# Altium PCB main.PcbDoc
Units mm, origin at the board's own origin, x right, y up, seen from the top; angles counter-clockwise.
Board outline 43.2 x 21.5 mm, 4 copper layers (Top Layer, GND, Power, Bottom Layer), stack 1.64 mm thick; 21 components, 21 nets, 74 pads, 14 vias.
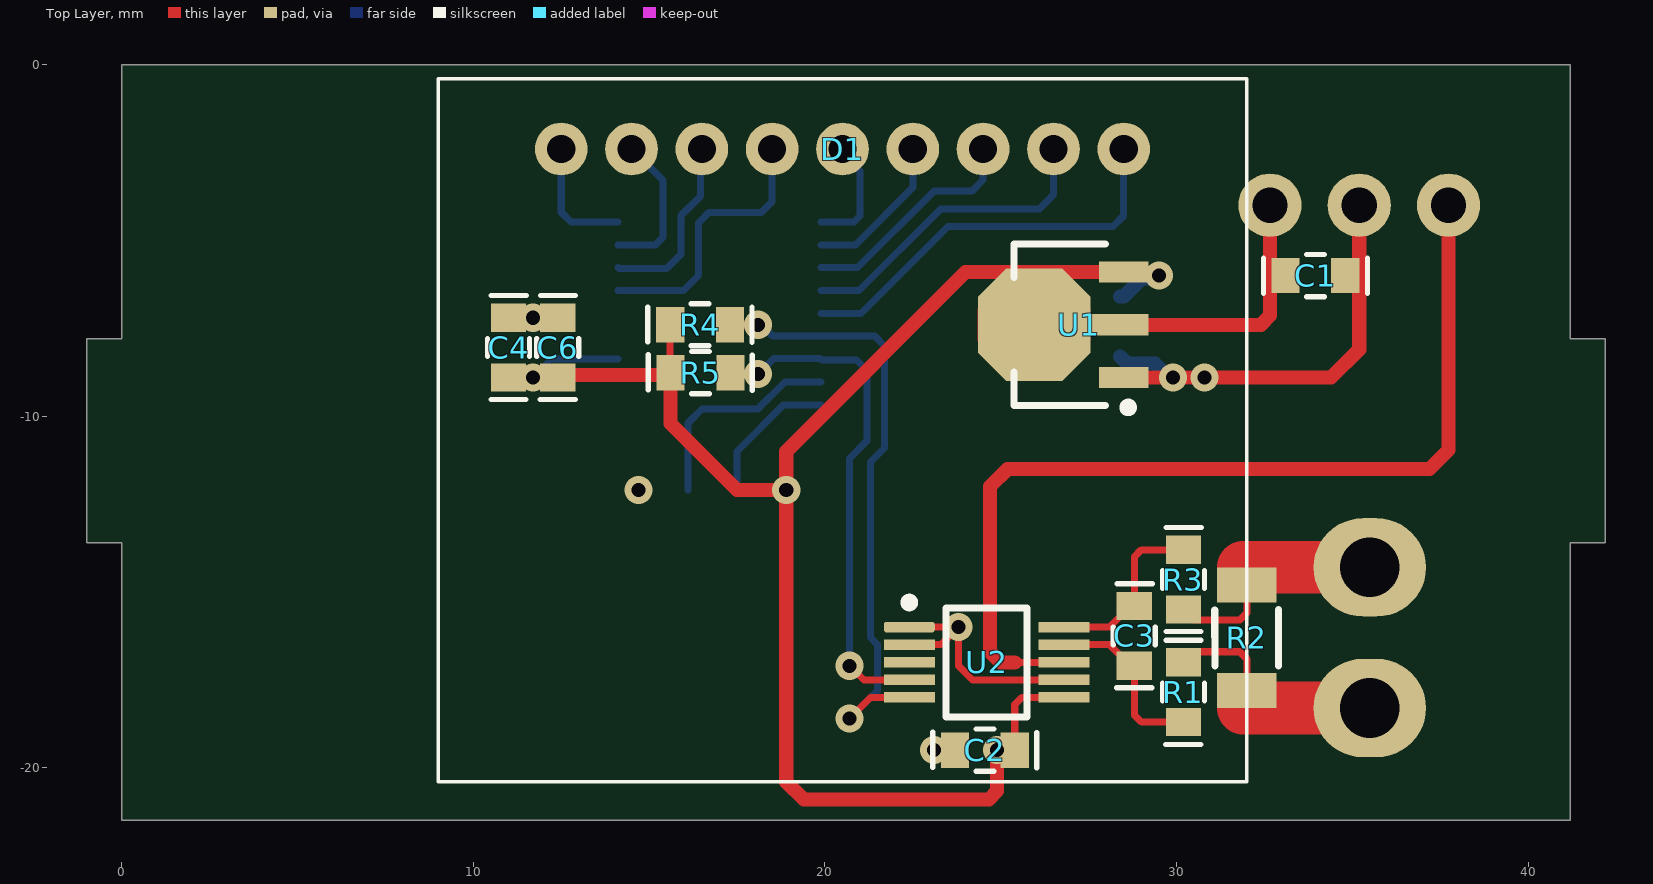
[diagram p0: Top Layer view]
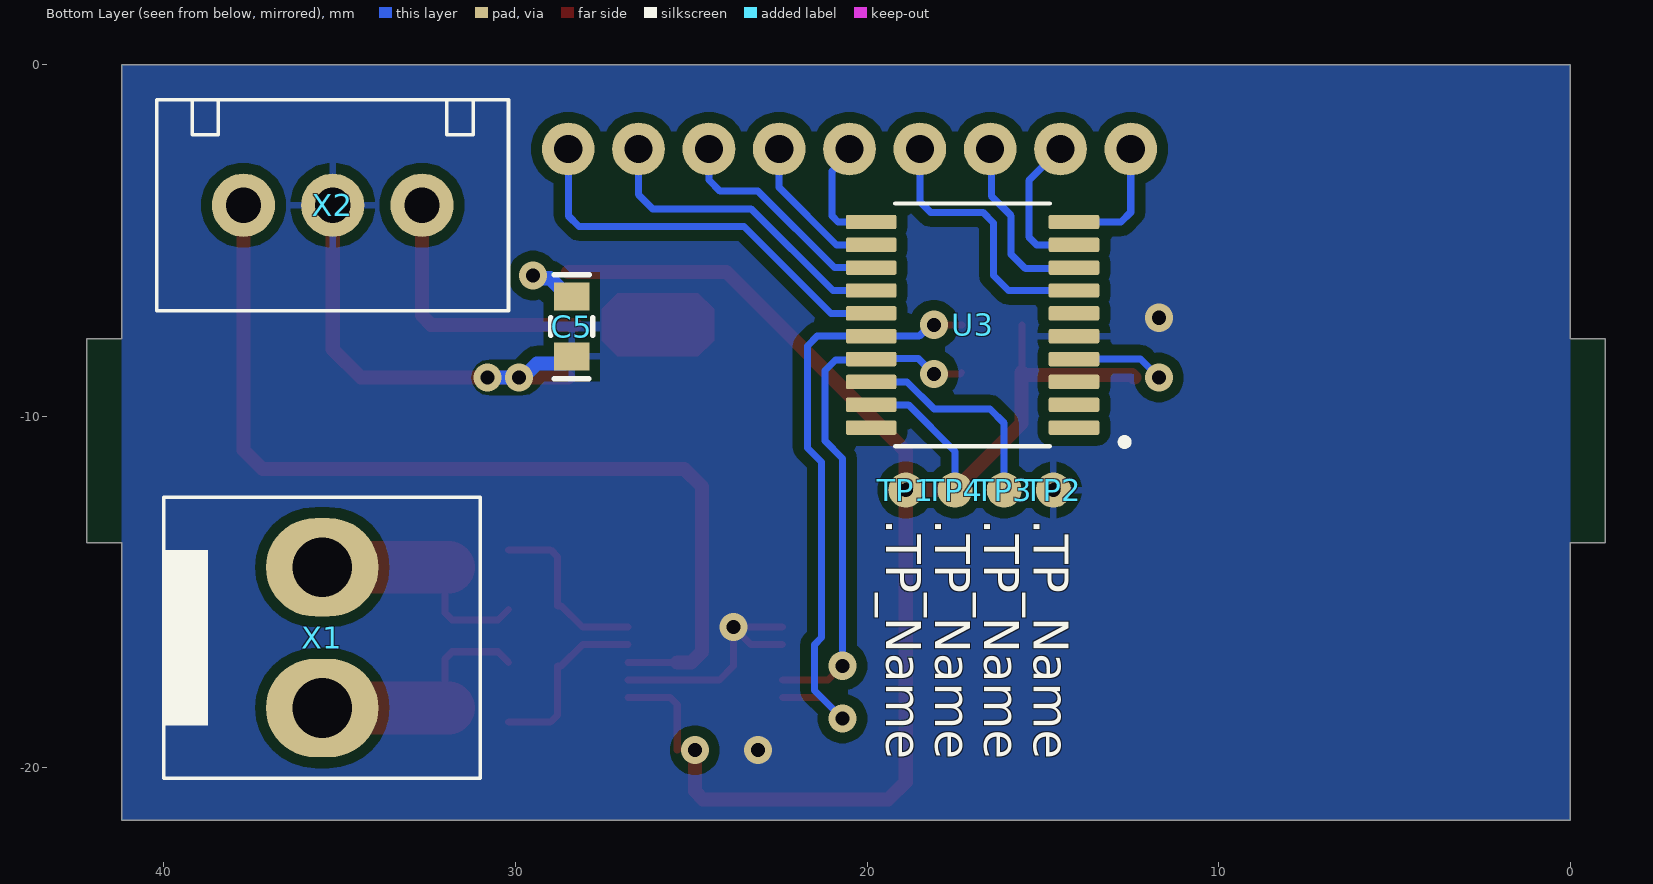
[diagram p1: Bottom Layer view, seen from below]
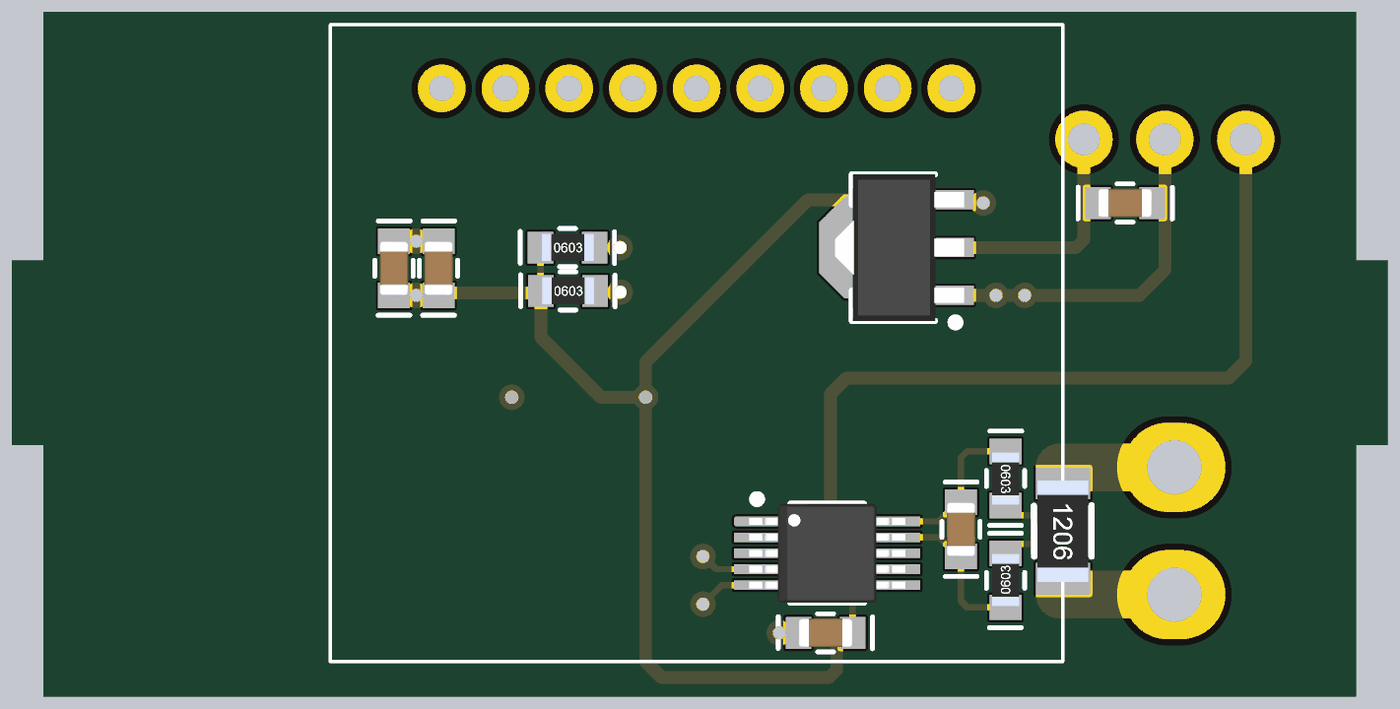
[diagram p2: 3D render of the assembled board from above, using the file's embedded part models]

## Layer stack, top to bottom
Top Solder: solder mask 0.01, Solder Resist, Dk 3.5
Top Layer: signal copper 0.035
Dielectric 1: prepreg 0.25, FR-4, Dk 4.2
GND: signal copper 0.035
Dielectric 4: core 1, PP-006, Dk 4.2
Power: signal copper 0.035
Dielectric 2: prepreg 0.25, Dk 4.2
Bottom Layer: signal copper 0.035
Bottom Solder: solder mask 0.01, Solder Resist, Dk 3.5

## Board outline
-1,-13.6 -1,-7.8 0,-7.8 0,0 41.2,0 41.2,-7.8 42.2,-7.8 42.2,-13.6 41.2,-13.6 41.2,-21.5 0,-21.5 0,-13.6

## Design rules (kind name [scope] priority, off if disabled: settings)
Clearance [All] p1: gap=0.2 ignorepadtopadclearanceinfootprint=FALSE except(0.3: Arc-Poly Track-Poly SMDPad-Poly THPad-Poly Via-Poly Fill-Poly Poly-Poly)
ComponentClearance ComponentClearance_LED [HasFootprint('Disp_7x6_seg')] p1: gap=-1 collisioncheckmode=3 verticalgap=-1 showdistances=FALSE
ComponentClearance [All] p2: gap=0 collisioncheckmode=3 verticalgap=0 showdistances=FALSE
DiffPairsRouting [All] p1: maxlimit=0.254 minlimit=0.254 mostfreqgap=0.254 toplayer_minwidth=0.381 toplayer_maxwidth=0.381 toplayer_prefwidth=0.381 midlayer1_minwidth=0.381 midlayer1_maxwidth=0.381 midlayer1_prefwidth=0.381 midlayer2_minwidth=0.381 midlayer2_maxwidth=0.381 midlayer2_prefwidth=0.381 bottomlayer_minwidth=0.3 bottomlayer_maxwidth=0.3 bottomlayer_prefwidth=0.3 substack1={8A457648-E2D5-4BE0-83BC-ABE9B91CE83C} toplayer_{8a457648-e2d5-4be0-83bc-abe9b91ce83c}_minwidth=0.381 toplayer_{8a457648-e2d5-4be0-83bc-abe9b91ce83c}_maxwidth=0.381 toplayer_{8a457648-e2d5-4be0-83bc-abe9b91ce83c}_prefwidth=0.381 midlayer1_{8a457648-e2d5-4be0-83bc-abe9b91ce83c}_minwidth=0.381 midlayer1_{8a457648-e2d5-4be0-83bc-abe9b91ce83c}_maxwidth=0.381 midlayer1_{8a457648-e2d5-4be0-83bc-abe9b91ce83c}_prefwidth=0.381 midlayer2_{8a457648-e2d5-4be0-83bc-abe9b91ce83c}_minwidth=0.381 midlayer2_{8a457648-e2d5-4be0-83bc-abe9b91ce83c}_maxwidth=0.381 midlayer2_{8a457648-e2d5-4be0-83bc-abe9b91ce83c}_prefwidth=0.381 bottomlayer_{8a457648-e2d5-4be0-83bc-abe9b91ce83c}_minwidth=0.381 bottomlayer_{8a457648-e2d5-4be0-83bc-abe9b91ce83c}_maxwidth=0.381 bottomlayer_{8a457648-e2d5-4be0-83bc-abe9b91ce83c}_prefwidth=0.381 substack2={3620B0BB-043D-4211-A41A-C4F79F826ABF} toplayer_{3620b0bb-043d-4211-a41a-c4f79f826abf}_minwidth=0.381 toplayer_{3620b0bb-043d-4211-a41a-c4f79f826abf}_maxwidth=0.381 toplayer_{3620b0bb-043d-4211-a41a-c4f79f826abf}_prefwidth=0.381 midlayer1_{3620b0bb-043d-4211-a41a-c4f79f826abf}_minwidth=0.381 midlayer1_{3620b0bb-043d-4211-a41a-c4f79f826abf}_maxwidth=0.381 midlayer1_{3620b0bb-043d-4211-a41a-c4f79f826abf}_prefwidth=0.381 midlayer2_{3620b0bb-043d-4211-a41a-c4f79f826abf}_minwidth=0.381 midlayer2_{3620b0bb-043d-4211-a41a-c4f79f826abf}_maxwidth=0.381 midlayer2_{3620b0bb-043d-4211-a41a-c4f79f826abf}_prefwidth=0.381 bottomlayer_{3620b0bb-043d-4211-a41a-c4f79f826abf}_minwidth=0.381 bottomlayer_{3620b0bb-043d-4211-a41a-c4f79f826abf}_maxwidth=0.381 bottomlayer_{3620b0bb-043d-4211-a41a-c4f79f826abf}_prefwidth=0.381 maxuncoupledlength=12.7
DiffPairsRouting DiffPairsRouting_ [All] p2: maxlimit=0.3 minlimit=0.3 mostfreqgap=0.3 toplayer_minwidth=0.3 toplayer_maxwidth=0.3 toplayer_prefwidth=0.3 midlayer1_minwidth=0.3 midlayer1_maxwidth=0.3 midlayer1_prefwidth=0.3 midlayer2_minwidth=0.3 midlayer2_maxwidth=0.3 midlayer2_prefwidth=0.3 bottomlayer_minwidth=0.381 bottomlayer_maxwidth=0.381 bottomlayer_prefwidth=0.381 substack1={8A457648-E2D5-4BE0-83BC-ABE9B91CE83C} toplayer_{8a457648-e2d5-4be0-83bc-abe9b91ce83c}_minwidth=0.381 toplayer_{8a457648-e2d5-4be0-83bc-abe9b91ce83c}_maxwidth=0.381 toplayer_{8a457648-e2d5-4be0-83bc-abe9b91ce83c}_prefwidth=0.381 midlayer1_{8a457648-e2d5-4be0-83bc-abe9b91ce83c}_minwidth=0.381 midlayer1_{8a457648-e2d5-4be0-83bc-abe9b91ce83c}_maxwidth=0.381 midlayer1_{8a457648-e2d5-4be0-83bc-abe9b91ce83c}_prefwidth=0.381 midlayer2_{8a457648-e2d5-4be0-83bc-abe9b91ce83c}_minwidth=0.381 midlayer2_{8a457648-e2d5-4be0-83bc-abe9b91ce83c}_maxwidth=0.381 midlayer2_{8a457648-e2d5-4be0-83bc-abe9b91ce83c}_prefwidth=0.381 bottomlayer_{8a457648-e2d5-4be0-83bc-abe9b91ce83c}_minwidth=0.381 bottomlayer_{8a457648-e2d5-4be0-83bc-abe9b91ce83c}_maxwidth=0.381 bottomlayer_{8a457648-e2d5-4be0-83bc-abe9b91ce83c}_prefwidth=0.381 substack2={3620B0BB-043D-4211-A41A-C4F79F826ABF} toplayer_{3620b0bb-043d-4211-a41a-c4f79f826abf}_minwidth=0.381 toplayer_{3620b0bb-043d-4211-a41a-c4f79f826abf}_maxwidth=0.381 toplayer_{3620b0bb-043d-4211-a41a-c4f79f826abf}_prefwidth=0.381 midlayer1_{3620b0bb-043d-4211-a41a-c4f79f826abf}_minwidth=0.381 midlayer1_{3620b0bb-043d-4211-a41a-c4f79f826abf}_maxwidth=0.381 midlayer1_{3620b0bb-043d-4211-a41a-c4f79f826abf}_prefwidth=0.381 midlayer2_{3620b0bb-043d-4211-a41a-c4f79f826abf}_minwidth=0.381 midlayer2_{3620b0bb-043d-4211-a41a-c4f79f826abf}_maxwidth=0.381 midlayer2_{3620b0bb-043d-4211-a41a-c4f79f826abf}_prefwidth=0.381 bottomlayer_{3620b0bb-043d-4211-a41a-c4f79f826abf}_minwidth=0.381 bottomlayer_{3620b0bb-043d-4211-a41a-c4f79f826abf}_maxwidth=0.381 bottomlayer_{3620b0bb-043d-4211-a41a-c4f79f826abf}_prefwidth=0.381 filterlayerstackid={B436D93C-42E4-4AC7-A21A-CA4998FC654C} maxuncoupledlength=12.7
Height HeightTop [OnTop] p1: minheight=0 maxheight=9 prefheight=7
Height HeightBottom [OnBottom] p2: minheight=0 maxheight=2.5 prefheight=2
HoleSize [All] p1: absolutevalues=TRUE maxlimit=10 minlimit=0.4 maxpercent=80.000 minpercent=20.000
HoleToHoleClearance [All] p1: gap=0.25 allowstackedmicrovias=TRUE
MinimumSolderMaskSliver [All] p1: minsoldermaskwidth=0.1
PlaneClearance [All] p1: clearance=0.4
PlaneConnect PlaneConnectHBR_CUR [InNetClass('HBR_CUR')] p1: planeconnectstyle=Direct reliefexpansion=0.508 reliefentries=4 reliefconductorwidth=0.254 reliefairgap=0.254
PlaneConnect PlaneConnectCASE [InNetClass('CASE')] p2: planeconnectstyle=Direct reliefexpansion=0.508 reliefentries=4 reliefconductorwidth=0.254 reliefairgap=0.254
PlaneConnect PlaneConnectVia [IsVia] p3: planeconnectstyle=Direct reliefexpansion=0.3 reliefentries=4 reliefconductorwidth=0.3 reliefairgap=0.4
PlaneConnect PlaneConnectAll [All] p4: planeconnectstyle=Relief reliefexpansion=0.3 reliefentries=4 reliefconductorwidth=0.3 reliefairgap=0.4
PolygonConnect PolygonConnectCASE [InNetClass('CASE')] p1: connectstyle=Direct reliefconductorwidth=0.254 reliefentries=4 polygonreliefangle="90 Angle" airgapwidth=0.254
PolygonConnect PolygonConnectVia [IsVia] p2: connectstyle=Direct reliefconductorwidth=0.254 reliefentries=4 polygonreliefangle="90 Angle" airgapwidth=0.254
PolygonConnect [All] p3: connectstyle=Relief reliefconductorwidth=0.2 reliefentries=4 polygonreliefangle="90 Angle" airgapwidth=0.3
RoutingCorners [All] p1: cornerstyle=45-Degree minsetback=2 maxsetback=2
RoutingVias [All] p1: holewidth=0.4 width=0.8 viastyle="Through Hole" minholewidth=0.3 minwidth=0.7 maxholewidth=1 maxwidth=1.4
SilkToSilkClearance [All] p1: silktosilkclearance=0
SilkToSolderMaskClearance [IsPad] p1: minsilkscreentomaskgap=0.12 clearancetoexposedcopper=TRUE
SolderMaskExpansion [All] p1: expansion=0.075 istentingtop=FALSE
SupplyNets "Schematic Supply Nets_2" [InNet('GND')] p1: voltage=0.000
SupplyNets "Schematic Supply Nets_1" [InNet('Vin')] p2: voltage=0.000
SupplyNets "Schematic Supply Nets" [InNet('3v3')] p3: voltage=0.000
Width [All] p1: maxlimit=5 minlimit=0.2 preferedwidth=0.2 substack1={8A457648-E2D5-4BE0-83BC-ABE9B91CE83C} substack2={3620B0BB-043D-4211-A41A-C4F79F826ABF}
19 further rules are at their usual default settings.

## Components (designator, comment, footprint, x,y, rotation, side; value= is the part's Value field where it differs from the comment)
C1 "K10-79" SMD_C0603 34.8,-6 r180 top value=0,1мкФ
C2 "K10-79" SMD_C0603 23.7,-19.5 r0 top value=0,1мкФ
C3 "K10-79" SMD_C0603 28.8,-15.4 r270 top value=0,1мкФ
C4 "K10-79" SMD_C0603 11,-7.2 r270 top value=0,1мкФ
C5 "K10-79" SMD_C0603 28.4,-8.3 r90 bottom value=0,1мкФ
C6 "K10-79" SMD_C0603 12.4,-7.2 r270 top value=0,1мкФ
D1 "Disp" Disp_7x6_seg 28.5,-2.4 r180 top locked
R1 "OSM R1-8" SMD_0603 30.2,-18.7 r90 top value=1k
R2 "OSM R1-8" SMD_1206 32,-14.8 r270 top value="50 мОм"
R3 "OSM R1-8" SMD_0603 30.2,-13.8 r270 top value=1k
R4 "OSM R1-8" SMD_0603 15.6,-7.4 r0 top value=4.7k
R5 "OSM R1-8" SMD_0603 15.612,-8.762 r0 top value=4.7k
TP1 "3v3" TP_PAD_1 18.9,-12.1 r270 bottom
TP2 "GND" TP_PAD_1 14.7,-12.1 r270 bottom
TP3 "SWD" TP_PAD_1 16.1,-12.1 r270 bottom
TP4 "SWC" TP_PAD_1 17.5,-12.1 r270 bottom
U1 "HT7133" SOT89 26.7,-7.4 r180 top
U2 "INA226" VSSOP-10 22.4,-16 r0 top
U3 "STM32G030F6P6" TSSOP_20 17,-7.4 r0 bottom
X1 "Cur_con" Cur_con 35.5,-14.3 r270 bottom
X2 "Pwr" Pwr_con 35.2,-4 r180 bottom

## Footprints (in the part's own frame and the unit in brackets; to place one, negate y for a bottom-side part, rotate by r counter-clockwise, add the part's x,y. Pads: shape width x height; smd on the part's side, far side on the other; paste and mask are expansions set on the pad)
Cur_con [mm]
  oval 2.8x3.2 hole 1.7 mask+0.2: 1(0,0) 2(4,0)
  silkscreen extent -2,-4.5 6,4.5
Disp_7x6_seg [mm]
  round 1.5 hole 0.8 mask+0.2: 1(0,0) 2(2,0) 3(4,0) 4(6,0) 5(8,0) 6(10,0) 7(12,0) 8(14,0) 9(16,0)
  silkscreen extent -3.5,-2 19.5,18
Pwr_con [mm]
  round 1.8 hole 1 mask+0.2: 1(-2.54,0) 2(0,0) 3(2.54,0)
  silkscreen extent -5,-3 5,3
SMD_0603 [mm]
  rect 0.8x1 smd: 1(0,0) 2(1.7,0)
  silkscreen extent -0.64,-0.6 2.32,0.6, body extent 0.04,-0.42 1.68,0.43, height 0.43
SMD_1206 [mm]
  rect 1x1.7 smd: 1(0,0) 2(3,0)
  silkscreen extent 0.7,-0.91 2.3,0.9, body extent -0.09,-0.8 3.11,0.8, height 0.44
SMD_C0603 [mm]
  rect 0.8x1 smd: 1(0,0) 2(1.7,0)
  silkscreen extent -0.64,-0.6 2.32,0.6, body extent 0,-0.45 1.7,0.45, height 0.9
SOT89 [mm] "SOT89, 3-Leads, Body 4,50x2,45mm, Pitch 1,50mm, Lead Span 4,1mm, IPC Medium Density"
  rect 1.4x0.6 smd: 1(-1.8,1.5) 3(-1.8,-1.5)
  rect 1.8x0.6 smd: 2(-1.6,0)
  oct 3.2x3.2 smd: 2(0.75,0)
  Top Layer region: 1.9,-0.9 2.35,-0.45 2.35,0.45 1.9,0.9 -0.4,0.9 -0.85,0.45 -0.85,-0.45 -0.4,-0.9
  silkscreen extent -2.05,-2.3 1.32,2.47, body extent -2.2,-2.3 1.85,2.3, height 1.6
TP_PAD_1 [mm]
  round 1 smd: 0(0,0)
TSSOP_20 [mm]
  rrect25% 1.44x0.41 smd: 1(-2.885,2.925) 2(-2.885,2.275) 3(-2.885,1.625) 4(-2.885,0.975) 5(-2.885,0.325) 6(-2.885,-0.325) 7(-2.885,-0.975) 8(-2.885,-1.625) 9(-2.885,-2.275) 10(-2.885,-2.925) 11(2.885,-2.925) 12(2.885,-2.275) 13(2.885,-1.625) 14(2.885,-0.975) 15(2.885,-0.325) 16(2.885,0.325) 17(2.885,0.975) 18(2.885,1.625) 19(2.885,2.275) 20(2.885,2.925)
  silkscreen extent -4.42,-3.45 2.2,3.45, body extent -3.2,-3.25 3.2,3.25, height 0.9
VSSOP-10 [mm] "Small Outline Package, 10-pin, 3x3mm, 1.1mm height"
  rrect50% 1.45x0.3 smd: 1(0,0)
  rect 1.45x0.3 smd: 2(0,-0.5) 3(0,-1) 4(0,-1.5) 5(0,-2) 6(4.4,-2) 7(4.4,-1.5) 8(4.4,-1) 9(4.4,-0.5) 10(4.4,0)
  silkscreen extent -0.12,-2.55 3.35,0.82, body extent -0.25,-2.55 4.65,0.55, height 1.1

## Part data
C1 C2 C3 C4 C5 C6: library part Capacitor, "Capacitor", Назначение=SMD-конденсатор, Наименование=К10-79, Напряжение=В, Потребление, Вт=0, Точность=%
R1 R2 R3 R4 R5: library part Resistor, "Resistor", Назначение=SMD-резистор, Наименование="ОСМ Р1-12", Потребление, Вт=0,001, Точность=%
TP1 TP2 TP3 TP4: library part TP, Назначение="Контроль параметров платы", Наименование="Точка проверки"
  TP1: TP_Name=3v3
  TP2: TP_Name=GND
  TP3: TP_Name=SWD
  TP4: TP_Name=SWC
U1: "Low-drop linear regulator", ComponentLink1Description=DataSheet, ComponentLink1URL=https://www.radiant.su/files/images/Kremhij-marketing/1278EP1T.pdf, Назначение="Линейный регулятор", Наименование=HT7133, Потребление, Вт=0,100
U2: "High- or Low-Side Measurement, Bidirectional Current and Power Monitor With I2C Interface", ComponentLink1Description="Data sheet", ComponentLink1URL=http://www.ti.com/lit/ds/symlink/ina226.pdf, DataSheet=https://www.ti.com/lit/ds/symlink/ina226.pdf?ts=1592809211957&ref_url=https%253A%252F%252Fwww.google.com%252F, Назначение="High-Side or Low-Side Measurement,", Наименование=INA226, Потребление, Вт=0,001
U3: "32-bit ARM Cortex-M0 MCU", Package=TSSOP-20, Price=None

## Via types
v1: diameter 0.8, hole 0.4, Top Layer to Bottom Layer, tented both sides, 14 vias

## Nets (pads, with @x,y where several pads share a name; then routed paths per layer and width w, separated by ;. In a path a pad name is that pad's centre, name@x,y a point inside that pad or via, vN(x,y) a via of type N, cw(c..) or ccw(c..) an arc to the next point about the centre after c; other vN are vias at no path point)
3v3: C2.2 C4.2 C5.2 C6.2 R4.1 R5.1 TP1.0 U1.3 U2.6 U3.4 | length 45.5
  Top Layer w0.2: R5.1@15.6,-8.75 R4.1 ; C2.2 25.4,-18.2 25.6,-18 U2.6
  Top Layer w0.4: C6.2 12.469,-8.831 15.519,-8.831 R5.1@15.6,-8.75 ; R5.1 15.612,-10.212 17.5,-12.1 v1(18.9,-12.1) ; v1(24.9,-19.5) 24.9,-20.666 24.666,-20.9 19.4,-20.9 18.9,-20.4 v1(18.9,-12.1) ; U1.3 24,-5.9 18.9,-11 v1(18.9,-12.1)
  Bottom Layer w0.2: v1(11.7,-8.9) 12.225,-8.375 U3.4
  Bottom Layer w0.4: C5.2 28.5,-6.6 29.023,-6.077 29.423,-6.077 v1(29.5,-6)
Dsp_1: D1.1 U3.15 | length 11.7
  Bottom Layer w0.2: U3.15 21.025,-7.075 23.5,-4.6 28.2,-4.6 28.5,-4.3 D1.1
Dsp_2: D1.2 U3.14 | length 9
  Bottom Layer w0.2: U3.14 20.975,-6.425 23.3,-4.1 26.1,-4.1 26.5,-3.7 D1.2
Dsp_3: D1.3 U3.13 | length 6.5
  Bottom Layer w0.2: U3.13 20.925,-5.775 23.1,-3.6 24.183,-3.6 24.5,-3.283 D1.3
Dsp_4: D1.4 U3.12 | length 4.4
  Bottom Layer w0.2: U3.12 20.875,-5.125 22.5,-3.5 D1.4
Dsp_5: D1.5 U3.11 | length 3.3
  Bottom Layer w0.2: U3.11 20.825,-4.475 21,-4.3 21,-3.031 20.5,-2.531 D1.5
Dsp_6: D1.6 U3.7 | length 7.8
  Bottom Layer w0.2: U3.7 15.975,-6.425 16.4,-6 16.4,-4.5 16.7,-4.2 18.2,-4.2 18.5,-3.9 D1.6
Dsp_7: D1.7 U3.8 | length 5.2
  Bottom Layer w0.2: U3.8 14.14,-5.8 15.5,-5.8 15.9,-5.4 15.9,-4.3 16.467,-3.733 16.467,-2.433 D1.7
Dsp_8: D1.8 U3.9 | length 4.3
  Bottom Layer w0.2: U3.9 15.175,-5.125 15.4,-4.9 15.4,-3.3 D1.8
Dsp_9: D1.9 U3.10 | length 3.5
  Bottom Layer w0.2: D1.9 12.5,-4.2 12.775,-4.475 U3.10
GND: C1.1 C2.1 C4.1 C5.1 C6.1 TP2.0 U1.1 U2.1 U2.2 U2.7 U3.5 X2.2 | length 21
  Top Layer w0.2: U2.2 23.3,-16.5 v1(23.8,-16) ; U2.1 v1(23.8,-16) ; U2.7 24.2,-17.5 23.8,-17.1 v1(23.8,-16)
  Top Layer w0.4: U1.1 v1(29.9,-8.9) v1(30.8,-8.9) 34.4,-8.9 35.2,-8.1 X2.2
  Bottom Layer w0.4: C5.1 28.6,-8.5 29.392,-8.5 29.792,-8.9 v1@30.746,-8.9
  other v1: 23.1,-19.5 14.7,-12.1 11.7,-7.2
I2C_SCL: R4.2 U2.5 U3.16 | length 17.8
  Top Layer w0.2: R4.2 v1(18.1,-7.4) ; v1(20.7,-18.6) 21.3,-18 U2.5
  Bottom Layer w0.2: v1(18.1,-7.4) 18.192,-7.4 18.517,-7.725 U3.16 21.425,-7.725 21.7,-8 21.7,-10.9 21.3,-11.3 21.3,-16.3 21.5,-16.5 21.5,-17.8 v1(20.7,-18.6)
I2C_SDA: R5.2 U2.4 U3.17 | length 14.7
  Top Layer w0.2: R5.2 17.35,-8.8 v1(18.1,-8.8) ; v1(20.7,-17.1) 20.717,-17.1 21.117,-17.5 U2.4
  Bottom Layer w0.2: v1(18.1,-8.8) 18.544,-8.356 19.866,-8.356 U3.17 19.91,-8.4 20.9,-8.4 21.2,-8.7 21.2,-10.7 20.7,-11.2 v1(20.7,-17.1)
I_sns_in: R2.1 R3.2 X1.1 | length 6.4
  Top Layer w0.2: R3.2 30.5,-15.8 31.8,-15.8 32,-15.6 R2.1
  Top Layer w1.5: 31.9,-14.3 X1.1
I_sns_out: R1.2 R2.2 X1.2 | length 6.5
  Top Layer w0.2: R1.2 30.5,-16.7 31.8,-16.7 32,-16.9 R2.2
  Top Layer w1.5: R2.2@31.9,-18.3 X1.2
NetC3_1: C3.1 R3.1 U2.10 | length 5.1
  Top Layer w0.2: U2.10 28.1,-16 28.7,-15.4 C3.1 28.8,-14 29,-13.8 R3.1
NetC3_2: C3.2 R1.1 U2.9 | length 5.1
  Top Layer w0.2: U2.9 28.1,-16.5 28.7,-17.1 C3.2 28.8,-18.5 29,-18.7 R1.1
SWC: TP4.0 U3.19 | length 4
  Bottom Layer w0.2: TP4.0 17.5,-11 18.825,-9.675 U3.19
SWD: TP3.0 U3.18 | length 6.2
  Bottom Layer w0.2: TP3.0 16.1,-10.2 16.5,-9.8 18.09,-9.8 18.865,-9.025 U3.18
U_sns: U2.8 X2.1 | length 27.4
  Top Layer w0.2: 25.4,-17 U2.8
  Top Layer w0.4: 25.4,-17 25,-17 24.7,-16.7 24.7,-12 25.2,-11.5 37.2,-11.5 37.74,-10.96 X2.1
Vin: C1.2 U1.2 X2.3 | length 7.6
  Top Layer w0.4: U1.2@28.3,-7.4 32.4,-7.4 32.66,-7.14 X2.3
pads on no net: U2.3 U3.1 U3.2 U3.3 U3.6 U3.20

## Polygon pours and split planes (outlines as drawn)
GND on Bottom Layer "NONET_L-01_P-001" (solid, pour order 0): 41.2,-21.5 41.2,0 0,0 0,-21.5

## Silkscreen, mask and mechanical layers (free items; w line width, h text height)
Mechanical 1:
  the board outline again, w0.1